# Altium PCB Zybo_Z7_Pcb.PcbDoc (part 4 of 8)
Units mm, origin at the board's own origin, x right, y up, seen from the top; angles counter-clockwise.
Board outline 122 x 88 mm, 8 copper layers (Top Layer, Layer 2, Layer 3, Layer 4, Layer 5, Layer 6, Layer 7, Bottom Layer), stack 1.625 mm thick; 658 components, 558 nets, 2538 pads, 924 vias.
Unrouted connection lines stored in the file: 1229.
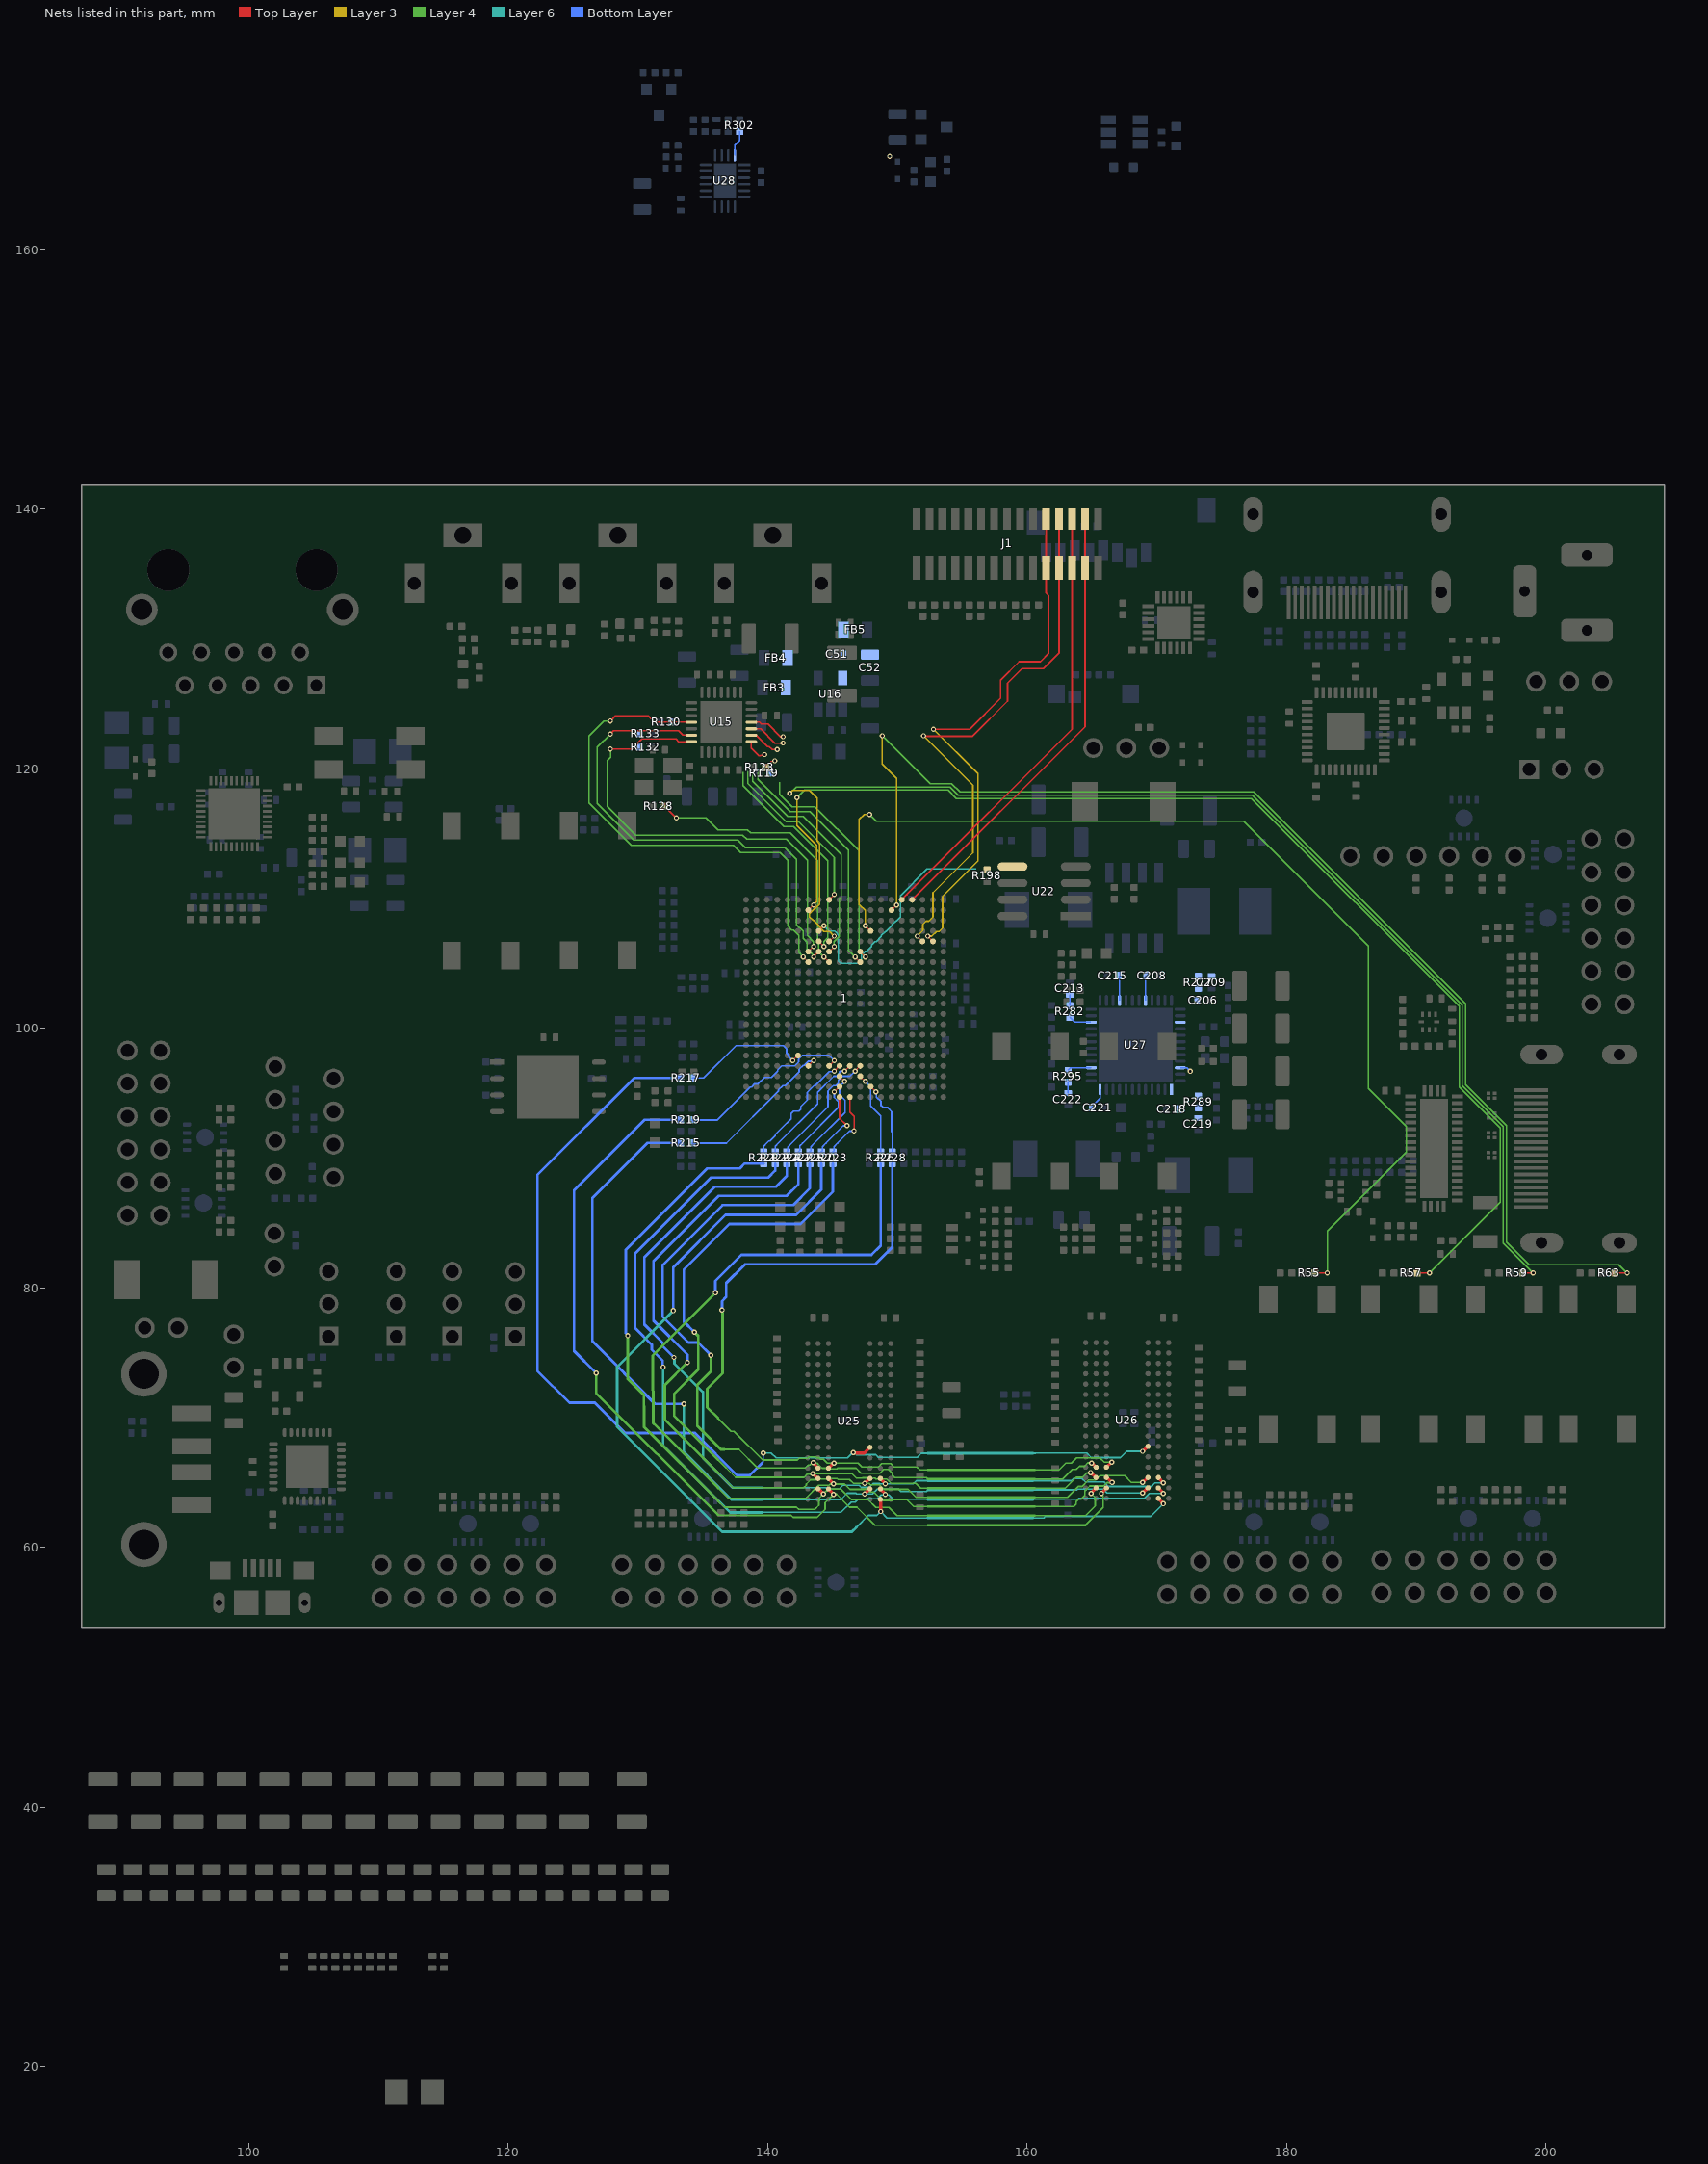
[diagram p9: the nets of this part, all layers, seen from the top]

## Via types
v1: diameter 0.4, hole 0.2, Top Layer to Bottom Layer, 249 vias
v2: diameter 0.4/0.2/0.2/0.2/0.2/0.2/0.2/0.2 (per signal layer), hole 0.2, Top Layer to Bottom Layer, 148 vias
v3: diameter 0.4/0.2/0.4/0.2/0.2/0.2/0.2/0.2 (per signal layer), hole 0.2, Top Layer to Bottom Layer, 136 vias
v4: diameter 0.4/0.2/0.2/0.4/0.2/0.2/0.2/0.2 (per signal layer), hole 0.2, Top Layer to Bottom Layer, 98 vias
v5: diameter 0.4/0.2/0.2/0.2/0.2/0.4/0.2/0.2 (per signal layer), hole 0.2, Top Layer to Bottom Layer, 68 vias
v6: diameter 0.4/0.4/0.2/0.2/0.4/0.2/0.4/0.4 (per signal layer), hole 0.2, Top Layer to Bottom Layer, 62 vias
v7: diameter 0.5, hole 0.2, Top Layer to Bottom Layer, 52 vias
v8: diameter 0.4/0.2/0.2/0.2/0.2/0.2/0.2/0.4 (per signal layer), hole 0.2, Top Layer to Bottom Layer, 31 vias
v9: diameter 0.5, hole 0.3, Top Layer to Bottom Layer, 25 vias
v10: diameter 0.4/0.4/0.2/0.2/0.4/0.4/0.4/0.4 (per signal layer), hole 0.2, Top Layer to Bottom Layer, 20 vias
v11: diameter 0.2/0.2/0.2/0.4/0.2/0.2/0.2/0.4 (per signal layer), hole 0.2, Top Layer to Bottom Layer, 15 vias
v12: diameter 0.2/0.2/0.2/0.2/0.2/0.4/0.2/0.4 (per signal layer), hole 0.2, Top Layer to Bottom Layer, 11 vias
v13: diameter 0.4/0.4/0.4/0.4/0.4/0.4/0.4/0.4 (per signal layer), hole 0.2, Top Layer to Bottom Layer, 5 vias
v14: diameter 0.4/0.2/0.2/0.2/0.2/0.4/0.2/0.4 (per signal layer), hole 0.2, Top Layer to Bottom Layer, 2 vias
v15: diameter 0.2/0.4/0.4/0.4/0.4/0.4/0.4/0.4 (per signal layer), hole 0.2, Top Layer to Bottom Layer, 2 vias

## Nets (pads, with @x,y where several pads share a name; then routed paths per layer and width w, separated by ;. In a path a pad name is that pad's centre, name@x,y a point inside that pad or via, vN(x,y) a via of type N, cw(c..) or ccw(c..) an arc to the next point about the centre after c; other vN are vias at no path point) (continued)
CAM_GPIO: (continued)
  Top Layer w0.131: v1(152.781,123.063) 155.575,123.063 157.957,125.445 157.957,126.842 159.385,128.27 161.036,128.27 161.671,128.905 161.671,133.35 161.471,133.55 J1.11@161.471,135.516 J1.11@161.471,139.266
  Layer 3 w0.124: v3(152.342,107.118) 152.651,107.118 153.013,107.48 153.228,107.48 153.488,107.741 153.488,110.181 156.21,112.903 156.21,119.634 v1(152.781,123.063)
CAM_SCL: 1.T20 J1.13 | length 34.8
  Top Layer w0.131: 1.T20@150.342,109.921 150.735,110.315 ; 150.735,110.318 163.471,123.053 J1.13@163.471,135.516 J1.13@163.471,139.266
CAM_SDA: 1.U20 J1.14 | length 34.9
  Top Layer w0.131: 1.U20@151.142,109.921 151.535,110.315 ; 151.535,110.318 164.471,123.253 J1.14@164.471,135.516 J1.14@164.471,139.266
COMP1: C206.1 R277.1 U27.39
COMP1_CAP: C209.1 R277.2
COMP2: R282.2 U27.22 | length 1.8
  Bottom Layer w0.1: R282.2@163.297,100.853 163.67,100.48 U27.22@164.905,100.48
COMP2_CAP: C213.2 R282.1 | length 0.9
  Bottom Layer w0.1: R282.1@163.297,101.753 C213.2@163.297,102.606
COMP3: R289.2 U27.46 | length 0.8
  Bottom Layer w0.1: U27.46@171.827,96.958 172.308,96.958 v1(172.568,96.698)
COMP3_CAP: C219.2 R289.1
COMP4: R295.2 U27.15 | length 1.9
  Bottom Layer w0.1: R295.2@163.17,96.767 163.355,96.953 164.921,96.953 U27.15@164.949,96.98
COMP4_CAP: C222.2 R295.1 | length 0.9
  Bottom Layer w0.1: C222.2@163.17,95.014 R295.1@163.17,95.867
CRYPTO_SDA: 1.H17 R198.1 U22.5 | length 19
  Top Layer w0.05: 1.H17@143.942,107.518 v5(144.342,107.918)
  Layer 6 w0.1: v5@144.335,107.918 144.742,107.511 145.166,107.511 145.26,107.418 145.266,107.418 145.465,107.219 145.465,105.209 145.636,105.038 146.966,105.038 147.242,105.314 147.242,105.642 147.544,105.944 147.633,105.944 147.998,106.309 147.998,106.438 148.259,106.699 148.375,106.699 148.774,107.098 148.774,107.181 149.077,107.484 149.139,107.484 149.582,107.927 149.582,107.975 149.891,108.285 149.926,108.285 150.235,108.594 150.235,110.23 152.298,112.293 156.083,112.293
  other v1: 149.403,167.208
DDR3_A0: R228.2 U25.N3 U26.N3 | length 65.8
  Top Layer w0.254: U25.N3@144.712,66.124 v4@145.094,66.505 ; U26.N3@166.135,66.196 v4@166.516,66.577
  Layer 4 w0.125: 136.184,69.965 137.187,68.961 137.414,68.961 139.624,66.751 142.305,66.751 142.432,66.878 143.068,66.878 143.186,66.997 143.734,66.997 143.802,66.929 143.956,66.929 144.083,66.802 144.312,66.802 144.609,66.505 v4(145.113,66.505) 146.971,66.505 147.265,66.211 148.548,66.211 148.805,66.468 149.491,66.468 149.737,66.222 151.507,66.222 151.745,65.983 152.349,65.983 ; 160.579,65.983 162.47,65.983 162.984,66.497 163.403,66.497 163.832,66.927 165.599,66.927 165.949,66.577 v4(166.535,66.577)
  Layer 4 w0.205: 136.184,69.965 135.346,70.803 135.346,72.246 136.539,73.44 136.539,78.119 136.526,78.133 136.526,78.271 v11(136.489,78.308) ; 152.349,65.983 160.579,65.983
  Bottom Layer w0.207: v11(136.489,78.308) 136.489,79.001 136.807,79.319 136.807,80.382 138.252,81.827 148.27,81.827 149.606,83.162 R228.2@149.606,89.593
DDR3_A0_FPGA: 1.N2 R228.1 | length 5.9
  Top Layer w0.05: 1.N2@147.942,95.518 v8(148.342,95.118)
  Bottom Layer w0.131: v8(148.342,95.118) 148.385,95.075 148.385,94.721 148.745,94.362 148.745,94.067 148.897,93.915 149.229,93.915 149.555,93.588 149.555,92.05 149.606,91.999 149.606,91.161 R228.1@149.606,90.493
DDR3_A1: R227.2 U25.P7 U26.P7 | length 71.2
  Top Layer w0.254: v4@147.493,64.942 U25.P7@147.875,65.324 ; v4@168.916,65.014 U26.P7@169.298,65.396
  Layer 4 w0.125: 136.184,65.746 137.312,64.618 142.792,64.618 142.987,64.813 142.987,64.893 143.321,65.227 143.728,65.227 143.778,65.278 144.591,65.278 144.642,65.329 145.353,65.329 145.429,65.253 146.318,65.253 146.629,64.942 v4(147.475,64.942) 147.823,64.942 147.919,64.846 148.63,64.846 148.985,64.491 150.825,64.491 151.447,63.869 152.349,63.869 ; 160.579,63.869 163.107,63.869 163.94,64.702 164.227,64.702 164.726,65.202 165.292,65.202 165.622,65.532 167.519,65.532 168.036,65.014 v4(168.897,65.014)
  Layer 4 w0.205: v11(133.822,74.27) 132.069,72.517 132.069,69.861 136.184,65.746 ; 152.349,63.869 160.579,63.869
  Bottom Layer w0.207: v11(133.822,74.27) 133.822,74.877 131.21,77.489 131.21,82.083 136.225,87.098 139.551,87.098 141.479,87.098 142.367,87.986 R227.2@142.367,89.593
DDR3_A1_FPGA: 1.K2 R227.1 | length 6.6
  Top Layer w0.05: v8(145.142,95.118) 1.K2@145.542,95.518
  Bottom Layer w0.131: R227.1@142.367,90.493 142.479,90.605 142.479,90.888 142.49,90.899 142.49,90.953 142.697,91.161 145.456,93.92 145.456,94.371 145.142,94.685 v8(145.142,95.118)
DDR3_A2: R226.2 U25.P3 U26.P3 | length 74.3
  Top Layer w0.254: U25.P3@144.694,65.305 v4@145.075,64.923 ; U26.P3@166.135,65.396 U26.P3@166.142,65.388 ; U26.P3@166.154,65.396 v4@166.535,65.014
  Layer 4 w0.125: 136.184,64.603 136.976,63.811 142.947,63.811 143.931,64.795 144.718,64.795 144.82,64.897 145.067,64.897 v4(145.075,64.905) 145.083,64.897 145.937,64.897 146.344,64.491 147.602,64.491 147.818,64.275 148.185,64.275 148.833,63.627 149.62,63.627 149.697,63.703 150.722,63.703 151.261,63.165 152.349,63.165 ; 160.579,63.165 163.59,63.165 163.785,63.36 163.785,63.544 163.968,63.727 164.152,63.727 164.44,64.015 164.44,64.349 164.835,64.745 165.902,64.745 166.167,65.01 166.549,65.01 v4(166.554,65.014)
  Layer 4 w0.205: v11(135.981,79.629) 131.142,74.79 131.142,74.538 131.142,74.535 131.192,69.678 131.193,69.594 131.252,69.535 136.184,64.603 ; 152.349,63.165 160.579,63.165
  Bottom Layer w0.207: v11(135.981,79.629) 135.981,80.554 137.989,82.563 148.007,82.563 148.717,83.273 R226.2@148.717,89.593
DDR3_A2_FPGA: 1.M3 R226.1 | length 6.5
  Top Layer w0.05: 1.M3@147.142,96.318 v8(147.542,95.918)
  Bottom Layer w0.131: v8(147.542,95.918) 147.938,95.522 147.938,94.048 148.717,93.269 148.717,91.161 R226.1@148.717,90.493
DDR3_A3: R225.2 U25.N2 U26.N2 | length 64.8
  Top Layer w0.254: v4@143.512,66.524 U25.N2@143.894,66.142 ; v4(164.974,66.515) 165.011,66.515 165.312,66.215 U26.N2@165.316,66.215
  Layer 4 w0.125: 136.652,67.564 137.795,67.564 139.217,66.142 142.915,66.142 143.143,66.37 143.265,66.37 143.438,66.543 v4(143.512,66.543) 143.565,66.49 143.836,66.49 143.88,66.447 144.21,66.116 144.794,66.116 144.845,66.065 145.353,66.065 145.404,66.116 146.826,66.116 147.207,65.735 148.664,65.735 148.946,66.017 149.301,66.017 149.6,65.718 149.6,65.576 149.783,65.393 152.235,65.393 152.349,65.279 ; 160.579,65.279 162.738,65.279 163.474,66.015 163.779,66.015 164.033,66.269 164.429,66.269 164.683,66.523 164.966,66.523 v4(164.974,66.515)
  Layer 4 w0.205: v11(135.625,74.828) 135.625,73.584 134.584,72.542 134.584,69.378 136.398,67.564 136.652,67.564 ; 152.349,65.279 160.579,65.279
  Bottom Layer w0.207: v11(135.625,74.828) 134.65,75.803 133.895,75.803 131.917,77.782 131.917,81.79 136.517,86.391 141.966,86.391 143.256,87.681 R225.2@143.256,89.593
DDR3_A3_FPGA: 1.K3 R225.1 | length 7.5
  Top Layer w0.05: 1.K3@145.542,96.318 v8(145.942,95.918)
  Bottom Layer w0.131: R225.1@143.256,90.493 143.339,90.576 143.339,90.888 143.612,91.161 145.974,93.523 145.974,94.463 145.546,94.89 145.546,95.507 145.942,95.903 v8(145.942,95.918)
DDR3_A4: R224.2 U25.P8 U26.P8 | length 70.3
  Top Layer w0.254: U25.P8@148.694,65.305 v5@149.075,64.923 ; U26.P8@170.116,65.377 v5@170.498,64.996
  Layer 6 w0.124: 139.587,64.618 144.49,64.618 144.591,64.516 145.527,64.516 145.806,64.795 147.055,64.795 147.22,64.63 147.829,64.63 148.147,64.948 148.63,64.948 148.673,64.905 v5(149.075,64.905) 151.214,64.905 151.46,65.151 152.349,65.151 ; 160.441,65.151 163.424,65.151 163.599,65.327 164.227,65.327 164.504,65.049 165.938,65.049 166.285,64.702 169.579,64.702 169.854,64.977 v5(170.498,64.977)
  Layer 6 w0.205: v12(132.78,74.651) 132.818,74.613 132.818,74.183 135.022,71.979 135.022,66.891 137.295,64.618 138.038,64.618 139.587,64.618 ; 152.349,65.151 160.441,65.151
  Bottom Layer w0.207: v12(132.78,74.651) 131.933,75.497 131.933,75.766 130.503,77.196 130.503,82.376 135.932,87.805 140.662,87.805 141.478,88.621 R224.2@141.478,89.593
DDR3_A4_FPGA: 1.M4 R224.1 | length 9.4
  Top Layer w0.05: v8(146.742,96.718) 1.M4@147.142,97.118
  Bottom Layer w0.131: R224.1@141.478,90.493 141.586,90.601 141.586,90.888 141.859,91.161 144.658,93.959 144.658,95.193 145.067,95.602 145.273,95.602 145.458,95.787 145.458,95.993 145.787,96.322 146.346,96.322 v8(146.742,96.718)
DDR3_A5: R223.2 U25.P2 U26.P2 | length 64.9
  Top Layer w0.254: v4@143.493,65.705 U25.P2@143.875,65.324 ; v4@164.916,65.777 U26.P2@165.298,65.396
  Layer 4 w0.125: 136.184,66.762 137.535,65.411 142.819,65.411 143.088,65.68 143.449,65.68 v4(143.475,65.705) 146.501,65.705 146.847,65.359 147.314,65.359 147.334,65.38 147.665,65.38 147.69,65.354 148.274,65.354 148.35,65.278 149.189,65.278 149.519,64.948 151.435,64.948 151.809,64.574 152.349,64.574 ; 160.579,64.574 162.948,64.574 163.782,65.408 164.264,65.408 164.602,65.745 164.865,65.745 v4(164.897,65.777)
  Layer 4 w0.205: v11(134.355,76.606) 134.66,76.302 134.66,73.711 132.806,71.857 132.806,70.14 136.184,66.762 ; 152.349,64.574 160.579,64.574
  Bottom Layer w0.207: v11(134.355,76.606) 133.542,77.419 133.542,77.773 133.538,77.777 133.538,81.413 137.051,84.925 142.533,84.925 145.034,87.427 R223.2@145.034,89.593
DDR3_A5_FPGA: 1.L1 R223.1 | length 5.2
  Top Layer w0.131: 1.L1@146.342,94.718 146.342,93.561 146.685,93.218 146.685,92.126 v8(146.66,92.1)
  Bottom Layer w0.131: R223.1@145.034,90.493 145.12,90.579 145.12,90.891 145.39,91.161 146.329,92.1 146.558,92.1 v8(146.66,92.1)
DDR3_A6: R222.2 U25.R8 U26.R8 | length 72.4
  Top Layer w0.254: U25.R8@148.694,64.505 v5@149.075,64.123 ; U26.R8@170.116,64.577 v5@170.498,64.196
  Layer 6 w0.124: 139.587,62.713 145.658,62.713 146.445,63.5 146.75,63.5 146.985,63.734 147.622,63.734 147.641,63.754 148.452,63.754 148.75,64.052 149.022,64.052 v5(149.075,64.105) 149.128,64.052 149.348,64.052 149.685,63.715 152.349,63.715 ; 160.441,63.715 163.9,63.715 163.991,63.807 169.044,63.807 169.415,64.177 v5(170.498,64.177)
  Layer 6 w0.205: v12(131.942,73.914) 131.942,67.894 137.124,62.713 139.587,62.713 ; 152.349,63.715 160.441,63.715
  Bottom Layer w0.207: v12(131.942,73.914) 131.905,73.951 131.905,74.417 131.068,75.253 131.068,75.631 129.796,76.903 129.796,82.668 135.639,88.511 140.048,88.511 140.589,89.052 R222.2@140.589,89.593
DDR3_A6_FPGA: 1.L4 R222.1 | length 9.3
  Top Layer w0.05: v8(145.942,96.718) 1.L4@146.342,97.118
  Bottom Layer w0.131: R222.1@140.589,90.493 140.589,90.932 140.818,91.161 143.858,94.201 143.858,95.08 145.1,96.322 145.306,96.322 145.538,96.554 145.538,96.641 145.614,96.718 v8(145.942,96.718)
DDR3_A7: R221.2 U25.R2 U26.R2 | length 69.3
  Top Layer w0.254: U25.R2@143.912,64.524 v4@144.294,64.142 ; v4@164.935,64.196 U26.R2@165.316,64.577
  Layer 4 w0.125: 136.184,63.587 136.652,63.119 142.234,63.119 142.418,62.935 143.635,62.935 143.956,63.256 143.956,63.786 v4(144.313,64.142) 144.668,64.497 145.651,64.497 146.445,63.703 147.741,63.703 148.35,63.094 149.352,63.094 149.986,62.46 152.349,62.46 ; 160.579,62.46 164.509,62.46 165.253,63.204 165.253,63.859 v4(164.935,64.177)
  Layer 4 w0.205: v11(129.224,76.327) 129.224,72.998 130.466,71.757 130.467,71.673 130.481,70.272 130.481,69.29 136.184,63.587 ; 152.349,62.46 160.579,62.46
  Bottom Layer w0.207: v11(129.224,76.327) 129.224,76.379 129.072,76.532 129.072,82.943 135.346,89.218 137.859,89.218 138.234,89.593 R221.2@139.7,89.593
DDR3_A7_FPGA: 1.K4 R221.1 | length 9.6
  Top Layer w0.05: v8(145.142,96.718) 1.K4@145.542,97.118
  Bottom Layer w0.131: R221.1@139.7,90.493 139.7,90.932 139.929,91.161 140.081,91.313 140.105,91.337 140.195,91.337 140.6,91.741 140.6,91.832 141.092,92.324 141.811,93.043 141.811,93.449 141.996,93.634 142.402,93.634 142.556,93.788 142.556,93.98 143.058,94.482 143.058,95.08 143.58,95.602 143.673,95.602 144.745,96.675 145.099,96.675 v8(145.142,96.718)
DDR3_A8: R220.2 U25.T8 U26.T8 | length 78.2
  Top Layer w0.254: v5(148.711,62.776) U25.T8@148.711,63.688 ; U26.T8@170.116,63.777 v5@170.498,63.396
  Layer 6 w0.124: 146.852,61.57 147.766,62.484 148.419,62.484 v5(148.711,62.776) ; v5@148.725,62.776 v5(148.711,62.776) ; 152.349,62.287 149.199,62.287 v5(148.711,62.776) ; 160.441,62.287 161.297,62.287 161.417,62.408 169.529,62.408 v5(170.498,63.377)
  Layer 6 w0.205: v12(132.729,78.257) 128.397,73.925 128.397,69.306 136.489,61.214 146.496,61.214 146.852,61.57 ; 152.349,62.287 160.441,62.287
  Bottom Layer w0.207: v12(132.729,78.257) 132.729,81.603 136.763,85.637 142.202,85.637 144.145,87.579 R220.2@144.145,89.593
DDR3_A8_FPGA: 1.K1 R220.1 | length 5.4
  Top Layer w0.131: 1.K1@145.542,94.718 145.542,93.091 v8(146.124,92.509)
  Bottom Layer w0.131: R220.1@144.145,90.493 144.228,90.576 144.228,90.888 144.501,91.161 145.837,92.497 146.111,92.497 v8(146.124,92.509)
DDR3_A9: R219.2 U25.R3 U26.R3 | length 74.6
  Top Layer w0.254: U25.R3@144.694,64.505 v4@145.075,64.123 ; v4@165.735,64.196 U26.R3@166.116,64.577
  Layer 4 w0.125: 136.184,62.509 136.208,62.484 141.809,62.484 141.961,62.332 143.828,62.332 144.439,62.942 144.439,63.468 v4(145.075,64.105) 145.08,64.11 145.328,64.11 146.318,63.119 146.877,63.119 148.275,61.721 152.349,61.721 ; 164.479,61.721 165.851,63.094 165.851,63.986 165.735,64.102 v4(165.735,64.177)
  Layer 4 w0.205: v11(126.786,73.457) 126.786,71.907 136.184,62.509 ; 152.349,61.721 164.479,61.721
  Bottom Layer w0.207: v11(126.786,73.457) 125.086,75.157 125.086,87.537 130.513,92.964 R219.2@133.281,92.964
DDR3_A9_FPGA: 1.J4 R219.1 | length 13.9
  Top Layer w0.05: 1.J4@144.742,97.118 v8(145.142,97.518)
  Bottom Layer w0.131: R219.1@134.181,92.939 136.116,92.939 138.668,95.491 138.761,95.491 139.003,95.733 139.268,95.733 139.769,96.234 140.304,96.234 140.782,96.712 140.782,96.804 141.091,97.114 142.097,97.114 142.394,97.411 142.394,97.616 142.691,97.914 144.746,97.914 v8(145.142,97.518)
DDR3_A10: R217.2 U25.L7 U26.L7 | length 83.3
  Top Layer w0.254: v5(146.608,67.315) 146.638,67.286 147.456,67.286 U25.L7@147.894,67.724 ; v5@168.916,67.414 U26.L7@169.298,67.796
  Layer 6 w0.1: v12(139.664,67.285) 140.273,67.285 140.653,66.905 146.142,66.905 146.552,67.315 v5(146.608,67.315) v5@146.64,67.315
  Layer 6 w0.124: v5@146.64,67.315 146.683,67.315 146.84,67.158 148.336,67.158 148.539,66.954 151.536,66.954 151.854,67.272 152.349,67.272 ; 160.441,67.272 160.668,67.272 160.68,67.285 164.592,67.285 164.948,66.929 167.201,66.929 167.687,67.414 v5(168.897,67.414)
  Layer 6 w0.205: 152.349,67.272 160.441,67.272
  Bottom Layer w0.131: 139.587,66.523 139.664,66.599 v12(139.664,67.285)
  Bottom Layer w0.207: R217.2@133.281,96.19 129.74,96.19 122.259,88.708 122.259,73.623 124.727,71.154 126.683,71.154 129.02,68.817 134.397,68.817 137.657,65.557 138.622,65.557 139.587,66.523
DDR3_A10_FPGA: 1.F5 R217.1 | length 10.1
  Top Layer w0.05: v8(141.942,97.518) 1.F5@142.342,97.918
  Bottom Layer w0.131: R217.1@134.181,96.19 135.077,96.19 137.566,98.679 141.227,98.679 141.458,98.449 141.458,98.115 141.554,98.019 141.554,97.906 v8(141.942,97.518)
DDR3_A11: R215.2 U25.R7 U26.R7 | length 70.9
  Top Layer w0.254: v5@147.493,64.142 U25.R7@147.875,64.524 ; v5@168.916,64.214 U26.R7@169.298,64.596
  Layer 6 w0.124: 139.587,63.703 145.658,63.703 146.141,64.186 146.826,64.186 146.87,64.142 v5(147.475,64.142) 148.099,64.142 148.454,64.497 150.097,64.497 150.281,64.313 152.236,64.313 152.349,64.426 ; 160.441,64.446 163.85,64.446 163.911,64.508 165.87,64.508 166.164,64.214 v5(168.897,64.214)
  Layer 6 w0.205: v12(133.542,71.069) 133.542,67.361 137.2,63.703 139.587,63.703 ; 152.349,64.426 152.369,64.446 160.441,64.446
  Bottom Layer w0.207: R215.2@133.281,91.186 130.734,91.186 126.499,86.951 126.499,75.891 131.321,71.069 v12(133.542,71.069)
DDR3_A11_FPGA: 1.G4 R215.1 | length 12.7
  Top Layer w0.05: 1.G4@143.142,97.118 v8(143.542,97.518)
  Bottom Layer w0.131: R215.1@134.181,91.161 136.831,91.161 140.826,95.156 140.826,95.249 141.18,95.602 141.386,95.602 142.421,96.637 142.421,96.843 142.735,97.158 142.828,97.158 143.145,97.475 143.499,97.475 v8(143.542,97.518)

## Text inside footprints (layer, text, board x,y; h text height)
J3: Mechanical 6 "PCB Edge" at 134.941,143.586 h0.65 r180
J4: Mechanical 6 "PCB Edge" at 123.003,143.586 h0.65 r180
J5: Mechanical 6 "PCB Edge" at 111.065,143.586 h0.65 r180
J6: Assembly Notes "PCB Edge" at 210.788,87.449 h1 r90
J7: Assembly Notes "PCB Edge" at 187.96,144.755 h1 r180